# Altium PCB powermodule.PcbDoc (part 1 of 2)
Units mil, origin at the board's own origin, x right, y up, seen from the top; angles counter-clockwise.
Board outline 3937.01 x 1771.65 mil, 2 copper layers (Top, Bottom); 128 components, 96 nets, 567 pads, 424 vias.
Unrouted connection lines stored in the file: 15.
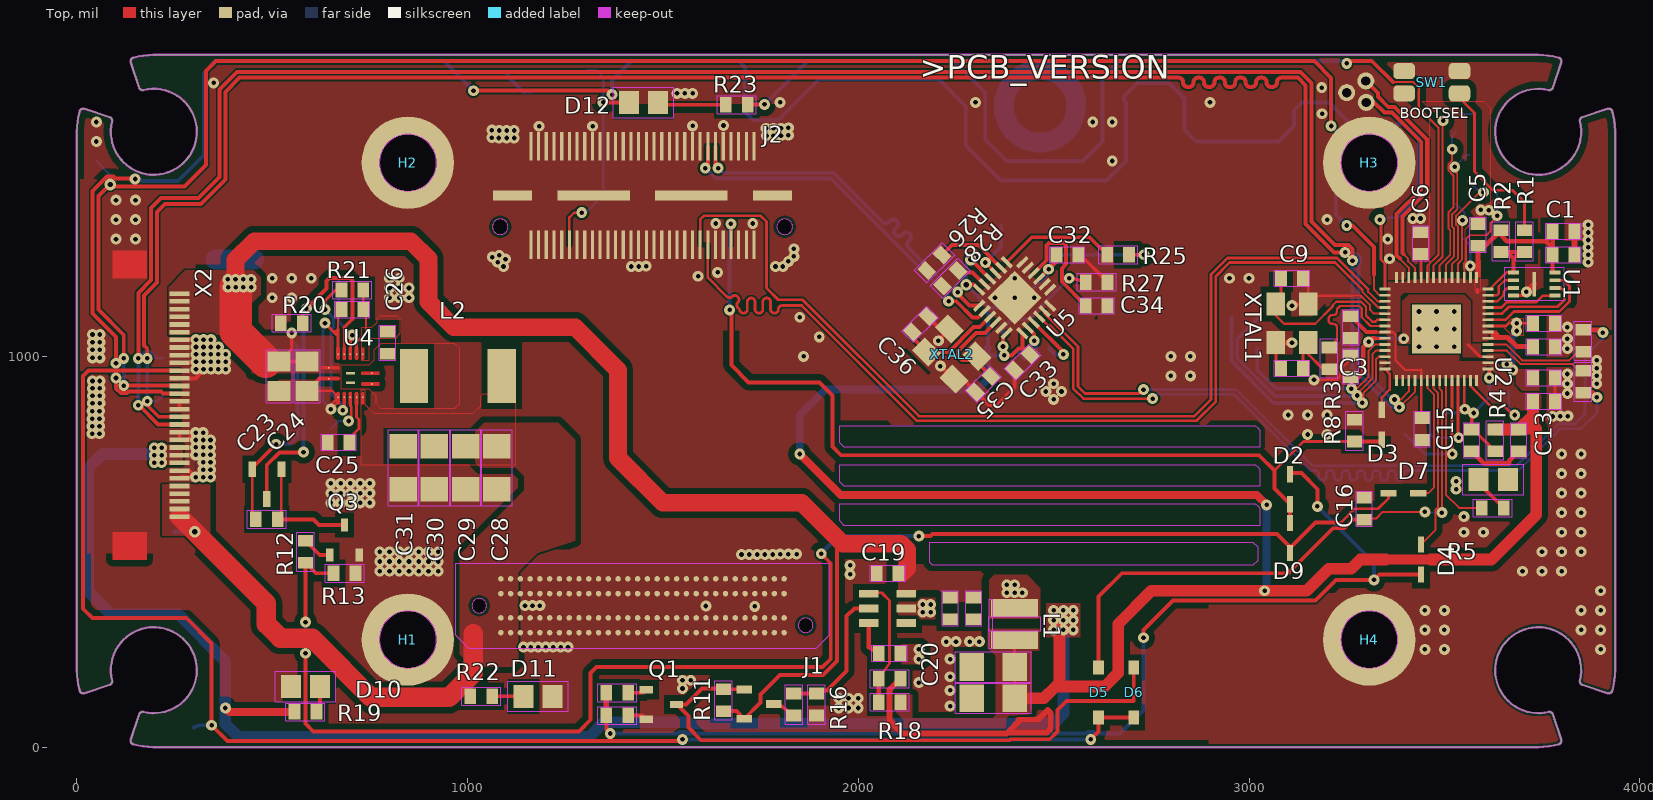
[diagram p0: Top view]
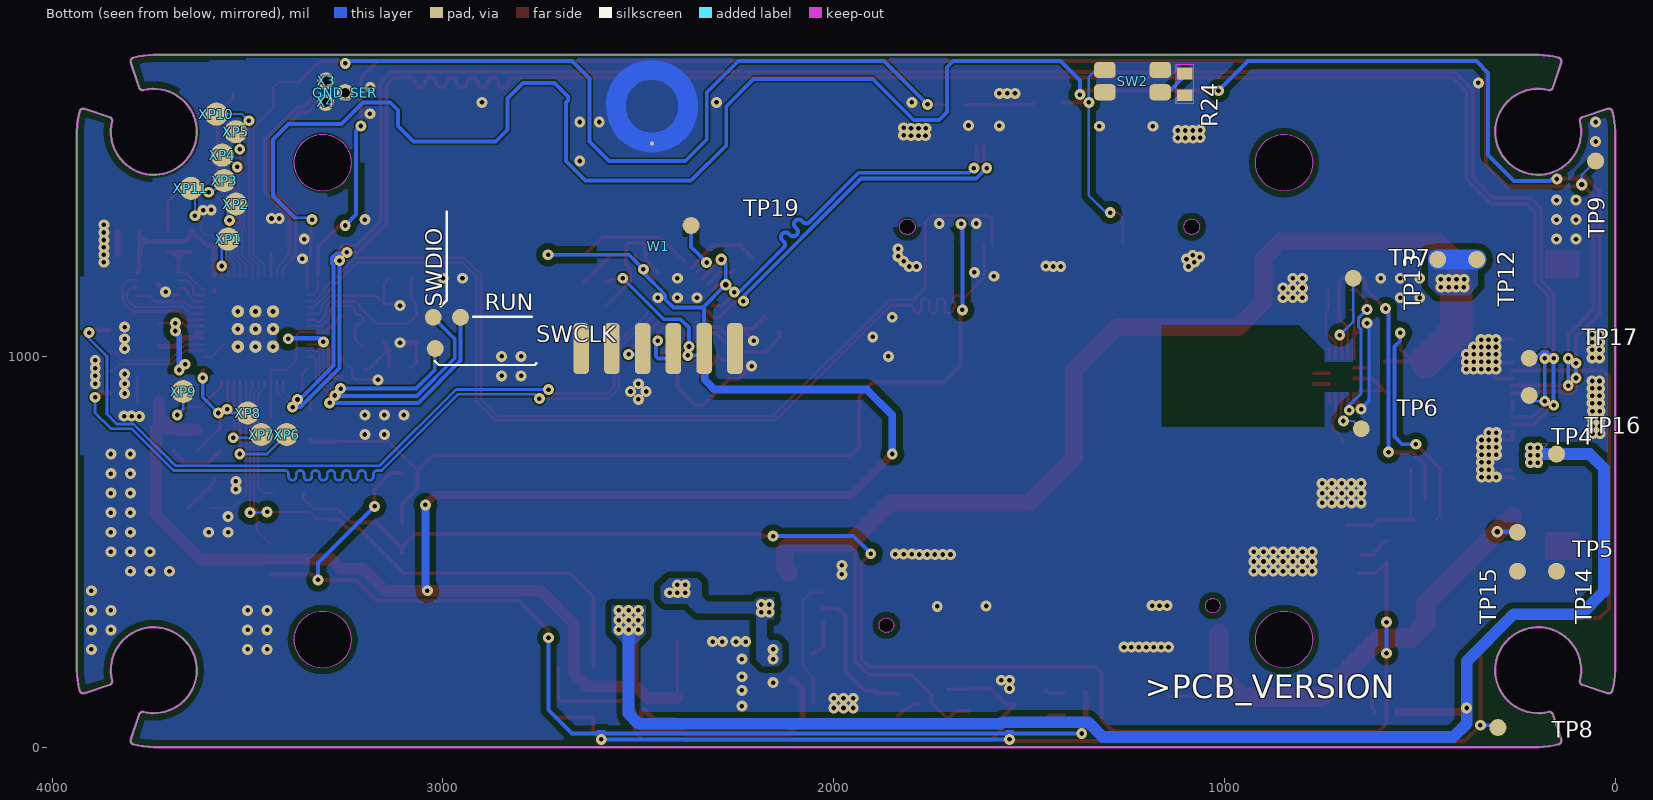
[diagram p1: Bottom view, seen from below]

## Layer stack, top to bottom
Top Solder: solder mask 0.4, Solder Resist, Dk 3.5
Top: signal copper 1.378
Dielectric 1: dielectric 12.6, FR-4, Dk 4.8
Bottom: signal copper 1.378
Bottom Solder: solder mask 0.4, Solder Resist, Dk 3.5

## Board outline
3792.87,1764.46 cw(c3789.83,1755.09) 3799.16,1751.93 3777.9,1688.1 cw(c3768.57,1691.22) 3766.48,1681.61 3765.69,1681.8 ccw(c3740.15,1574.8) 3705.39,1470.44 3714.62,1467.81 ccw(c3740.16,1574.8) 3847.02,1600.9 cw(c3856.58,1603.21) 3853.47,1612.55 3917.33,1633.82 cw(c3920.45,1624.48) 3929.99,1626.9 cw(c3740.12,1574.81) 3936.26,1591.93 3937.01,1574.8 3937.01,196.85 cw(c3740.16,196.87) 3929.7,143.72 3929.67,143.73 cw(c3920.44,147.17) 3917.33,137.83 3853.47,159.1 cw(c3856.59,168.44) 3847.02,170.78 ccw(c3740.16,196.86) 3639.22,240.58 3635.79,231.62 ccw(c3740.16,196.85) 3766.23,89.98 cw(c3768.57,80.42) 3777.91,83.54 3799.18,19.67 cw(c3789.84,16.56) 3794.02,7.65 3794.08,7.53 cw(c3740.16,196.85) 3740.16,0 196.85,0 195.06,0.01 cw(c196.83,196.85) 144.56,7.07 cw(c147.17,16.56) 137.83,19.67 159.1,83.54 cw(c168.44,80.42) 170.78,89.98 ccw(c196.85,196.85) 301.22,231.62 297.79,240.58 ccw(c196.85,196.86) 89.98,170.78 cw(c80.42,168.44) 83.54,159.1 19.67,137.83 cw(c16.56,147.17) 7.07,144.56 cw(c196.82,196.84) 0,196.85 0,1574.8 cw(c196.86,1574.82) 7.07,1627.1 cw(c16.56,1624.48) 19.67,1633.82 83.54,1612.55 cw(c80.42,1603.22) 89.98,1600.88 ccw(c196.85,1574.8) 297.79,1531.07 301.22,1540.04 ccw(c196.86,1574.8) 170.78,1681.67 cw(c168.44,1691.24) 159.1,1688.12 137.83,1751.98 cw(c147.17,1755.09) 144.56,1764.58 cw(c196.87,1574.81) 195.06,1771.65 196.85,1771.65 3740.16,1771.65 cw(c3740.16,1574.81)
cut-out: 847.2,1422.78 ccw(c847.2,1495.61) 920.03,1495.61 ccw(c847.2,1495.61) 847.2,1568.44 ccw(c847.2,1495.61) 774.37,1495.61 ccw(c847.2,1495.61)
cut-out: 847.2,202.29 ccw(c847.2,275.13) 920.03,275.13 ccw(c847.2,275.13) 847.2,347.96 ccw(c847.2,275.13) 774.37,275.13 ccw(c847.2,275.13)
cut-out: 3307.83,202.29 ccw(c3307.83,275.13) 3380.66,275.13 ccw(c3307.83,275.13) 3307.83,347.96 ccw(c3307.83,275.13) 3234.99,275.13 ccw(c3307.83,275.13)
cut-out: 3307.83,1422.78 ccw(c3307.83,1495.61) 3380.66,1495.61 ccw(c3307.83,1495.61) 3307.83,1568.44 ccw(c3307.83,1495.61) 3234.99,1495.61 ccw(c3307.83,1495.61)
cut-out: 1083.6,1311.75 ccw(c1083.6,1331.75) 1103.6,1331.75 ccw(c1083.6,1331.75) 1083.6,1351.75 ccw(c1083.6,1331.75) 1063.6,1331.75 ccw(c1083.6,1331.75)
cut-out: 1811.6,1311.75 ccw(c1811.6,1331.75) 1831.6,1331.75 ccw(c1811.6,1331.75) 1811.6,1351.75 ccw(c1811.6,1331.75) 1791.6,1331.75 ccw(c1811.6,1331.75)
cut-out: 1029.89,343.05 ccw(c1029.89,361.75) 1048.59,361.75 ccw(c1029.89,361.75) 1029.89,380.45 ccw(c1029.89,361.75) 1011.19,361.75 ccw(c1029.89,361.75)
cut-out: 1865.33,293.05 ccw(c1865.33,311.75) 1884.03,311.75 ccw(c1865.33,311.75) 1865.33,330.45 ccw(c1865.33,311.75) 1846.63,311.75 ccw(c1865.33,311.75)

## Design rules (kind name [scope] priority, off if disabled: settings)
BoardOutlineClearance mdCopperDimension [All] p1: gap=10 ignorepadtopadclearanceinfootprint=FALSE except(0: Arc-SplitContinuation Track-SplitContinuation SMDPad-SplitContinuation THPad-SplitContinuation Via-SplitContinuation Fill-SplitContinuation Poly-SplitContinuation Region-SplitContinuation Text-SplitContinuation; 7.87: Poly-OutlineEdge Poly-CavityEdge Poly-CutoutEdge Poly-SplitBarrior)
Clearance Clearance_for_PolygonClass_Isolate_16 [InPolygonClass('Isolate_16') vs IsArc Or IsTrack Or IsPad Or IsVia Or IsFill Or IsRegion Or IsText] p1: gap=16 ignorepadtopadclearanceinfootprint=FALSE
Clearance Clearance_for_PolygonClass_Isolate_20 [InPolygonClass('Isolate_20') vs IsArc Or IsTrack Or IsPad Or IsVia Or IsFill Or IsRegion Or IsText] p2: gap=20 ignorepadtopadclearanceinfootprint=FALSE
Clearance Clearance_for_PolygonClass_Isolate_10 [InPolygonClass('Isolate_10') vs IsArc Or IsTrack Or IsPad Or IsVia Or IsFill Or IsRegion Or IsText] p3: gap=10 ignorepadtopadclearanceinfootprint=FALSE
Clearance "Clearance (Same Net)" [All] p4: gap=5 ignorepadtopadclearanceinfootprint=FALSE
Clearance [All] p5: gap=5 ignorepadtopadclearanceinfootprint=FALSE
HoleSize "HoleSize_For_NetClass_dif pairs" [InNetClass('dif pairs')] p1: absolutevalues=TRUE maxlimit=0 minlimit=0 maxpercent=80.000 minpercent=20.000
HoleSize [All] p2: absolutevalues=TRUE maxlimit=100000 minlimit=11.81 maxpercent=80.000 minpercent=20.000
HoleToHoleClearance mdDrill [All] p1: gap=6 allowstackedmicrovias=TRUE
MinimumSolderMaskSliver [All] p1 off: minsoldermaskwidth=10
PasteMaskExpansion Expansion_SMDPaste_OFF [InPadClass('SMDPaste_OFF')] p1: expansion=0
PasteMaskExpansion mlMinCreamFrame [All] p2: expansion=0
PolygonConnect PolygonConnect_For_PolygonThermal_ON_Width100000_Gap100000 [InPolygonClass('PolygonThermal_ON_Width100000_Gap100000') vs Not IsVia] p1: connectstyle=Relief reliefconductorwidth=10 reliefentries=4 polygonreliefangle="90 Angle" airgapwidth=10
PolygonConnect PolygonConnect_For_PolygonThermal_ON_Width50000_Gap100000 [InPolygonClass('PolygonThermal_ON_Width50000_Gap100000') vs Not IsVia] p2: connectstyle=Relief reliefconductorwidth=5 reliefentries=4 polygonreliefangle="90 Angle" airgapwidth=10
PolygonConnect PolygonConnect_For_PolygonThermal_ON_Width60000_Gap100000 [InPolygonClass('PolygonThermal_ON_Width60000_Gap100000') vs Not IsVia] p3: connectstyle=Relief reliefconductorwidth=6 reliefentries=4 polygonreliefangle="90 Angle" airgapwidth=10
PolygonConnect PolygonConnect_For_PolygonThermal_ON_Width200000_Gap100000 [InPolygonClass('PolygonThermal_ON_Width200000_Gap100000') vs Not IsVia] p4: connectstyle=Relief reliefconductorwidth=20 reliefentries=4 polygonreliefangle="90 Angle" airgapwidth=10
PolygonConnect PolygonConnect_For_PolygonThermal_ON_Width70000_Gap100000 [InPolygonClass('PolygonThermal_ON_Width70000_Gap100000') vs Not IsVia] p5: connectstyle=Relief reliefconductorwidth=7 reliefentries=4 polygonreliefangle="90 Angle" airgapwidth=10
PolygonConnect PolygonConnect_For_PolygonThermal_OFF [InPolygonClass('PolygonThermal_OFF')] p6: connectstyle=Direct reliefconductorwidth=10 reliefentries=4 polygonreliefangle="90 Angle" airgapwidth=10
PolygonConnect ThermalVias [IsVia] p7: connectstyle=Direct reliefconductorwidth=10 reliefentries=4 polygonreliefangle="90 Angle" airgapwidth=10
PolygonConnect [All] p8: connectstyle=Relief reliefconductorwidth=10 reliefentries=4 polygonreliefangle="90 Angle" airgapwidth=10
RoutingVias [All] p1: holewidth=11.81 width=17.81 viastyle="Through Hole" minholewidth=11.81 minwidth=17.81 maxholewidth=100 maxwidth=100
SolderMaskExpansion Expansion_SMDSolder_OFF [InPadClass('SMDSolder_OFF')] p1: expansion=0 istentingtop=FALSE
SolderMaskExpansion mlMinStopFrame [All] p2: expansion=4 istentingtop=FALSE
Width "Width_For_NetClass_dif pairs" [InNetClass('dif pairs')] p1: maxlimit=10 minlimit=99999 preferedwidth=5 toplayer_minwidth=0 bottomlayer_minwidth=0
Width [All] p2: maxlimit=10 minlimit=5 preferedwidth=5
26 further rules are at their usual default settings.

## Classes and differential pairs
polygon class PolygonThermal_ON_Width100000_Gap100000: Polygon_13_Net_GND
polygon class PolygonThermal_ON_Width50000_Gap100000: Polygon_2_Net_+1V1 Polygon_3_Net_+1V1 Polygon_15_Net_GND Polygon_16_Net_GND
polygon class PolygonThermal_ON_Width200000_Gap100000: Polygon_6_Net_+3V3
polygon class PolygonThermal_ON_Width70000_Gap100000: Polygon_3_Net_N$8 Polygon_7_Net_+3V3 Polygon_8_Net_+3V3 Polygon_8_Net_GND Polygon_10_Net_GND Polygon_11_Net_GND Polygon_12_Net_GND Polygon_14_Net_GND Polygon_18_Net_GND
polygon class PolygonThermal_OFF: Polygon_1_Net_+1V1 Polygon_1_Net_+3V3 Polygon_1_Net_+5V Polygon_1_Net_+12V Polygon_1_Net_GND Polygon_1_Net_N$2 Polygon_1_Net_N$8 Polygon_1_Net_N$19 Polygon_2_Net_+3V3 Polygon_2_Net_+5V Polygon_2_Net_+12V Polygon_2_Net_GND Polygon_2_Net_N$8 Polygon_3_Net_+3V3 Polygon_3_Net_+5V Polygon_3_Net_+12V Polygon_3_Net_GND Polygon_4_Net_+3V3 Polygon_4_Net_+12V Polygon_4_Net_GND Polygon_4_Net_N$8 Polygon_5_Net_+3V3 Polygon_5_Net_GND Polygon_5_Net_N$8 Polygon_7_Net_GND Polygon_9_Net_GND Polygon_17_Net_GND
polygon class Isolate_16: Polygon_2_Net_GND Polygon_3_Net_GND
polygon class Isolate_20: Polygon_1_Net_+12V
polygon class Isolate_10: Polygon_1_Net_N$8
pad class SMDSolder_OFF: W1-P$1 X2-1 X2-2 X2-3 X2-4 X2-5 X2-6 X2-7 X2-8 X2-9 X2-10 X2-11 X2-12 X2-13 X2-14 X2-15 X2-16 X2-17 X2-18 X2-19 X2-20 X2-21 X2-22 X2-23 X2-24 X2-25 X2-26 X2-27 X2-28 X2-29 X2-30
pad class SMDPaste_OFF: -TP H1-P$1 H2-P$1 H3-P$1 H4-P$1 SWCLK-TP SWDIO-TP TP4-TP TP5-TP TP6-TP TP7-TP TP8-TP TP9-TP TP12-TP TP13-TP TP14-TP TP15-TP TP16-TP TP17-TP TP19-TP U2-57 W1-P$1 X2-1 X2-2 X2-3 X2-4 X2-5 X2-6 X2-7 X2-8 X2-9 X2-10 X2-11 X2-12 X2-13 X2-14 X2-15 X2-16 X2-17 X2-18 X2-19 X2-20 X2-21 X2-22 X2-23 X2-24 X2-25 X2-26 X2-27 X2-28 X2-29 X2-30
net class "dif pairs": D_N D_P USB_D_N USB_D_P

## Components (designator, comment, footprint, x,y, rotation, side; value= is the part's Value field where it differs from the comment)
C1 "100nF" C0603 3805,1320 r0 top
C2 "2u2F" C0603 3805,1260 r0 top
C3 "100nF" C0603 3260,1075 r90 top
C4 "2u2F" C0603 3755,945 r180 top
C5 "100nF" C0603 3586,1311 r90 top
C6 "100nF" C0603 3440,1290 r90 top
C7 "2u2F" C0603 3755,885 r180 top
C8 "100nF" C0603 3260,975 r90 top
C9 "10pF" C0603 3110,1200 r180 top
C10 "10pF" C0603 3110,970 r180 top
C11 "2u2F" C0603 3570,785 r90 top
C12 "100nF" C0603 3755,1025 r0 top
C13 "100nF" C0603 3690,785 r270 top
C14 "100nF" C0603 3755,1085 r180 top
C15 "100nF" C0603 3443,814 r90 top
C16 "100nF" C0603 3295,610 r90 top
C17 "10uF" C0603 2235,355 r270 top
C18 "10uF" C0603 2295,355 r270 top
C19 "100nF" C0603 2075,445 r180 top
C20 "100nF" C0603 2080,240 r0 top
C21 "22uF" C1206 2345,125 r180 top
C22 "22uF" C1206 2345,205 r180 top
C23 "10uF" C0805 517.76,949.21 r270 top
C24 "10uF" C0805 589.49,949.21 r270 top
C25 "4u7F" C0603 670,780 r180 top
C26 "100nF" C0603 795,1035 r270 top
C27 "2u2F" C0603 705,1120 r180 top
C28 "22uF" C1206 1075,715 r270 top
C29 "22uF" C1206 995,715 r270 top
C30 "22uF" C1206 915,715 r270 top
C31 "22uF" C1206 835,715 r270 top
C32 "1uF" C0603 2535,1260 r0 top
C33 "100nF" C0603 2420,985 r225 top
C34 "1uF" C0603 2610,1130 r0 top
C35 "10pF" C0603 2320,929 r225 top
C36 "10pF" C0603 2158,1082 r225 top
D1 "YL" LED_0805 3625,685 r0 top
D2 "1N4148WS" SOD323_NEX-L 3105,660 r270 top
D3 "1N4148WS" SOD323_NEX-L 3340,825 r90 top
D4 "1N4148WS" SOD323_NEX-L 3440,480 r90 top
D5 "" SOD-123_ONS-L 2615,140 r90 top
D6 "" SOD-123_ONS-L 2705,140 r90 top
D7 "1N4148WS" SOD323_NEX-L 3395,650 r0 top
D9 "1N4148WS" SOD323_NEX-L 3105,535 r90 top
D10 "GN" LED_0805 585,155 r180 top
D11 "BL" LED_0805 1180,130 r0 top
D12 "YL" LED_0805 1450,1650 r180 top
GND_SER "" TH-0.75/0.6 3250,1675 r180 bottom
H1 "" SMT_SPACER_5MMX2.5M 847.2,275.13 r0 top
H2 "" SMT_SPACER_5MMX2.5M 847.2,1495.61 r0 top
H3 "" SMT_SPACER_5MMX2.5M 3307.83,1495.61 r0 top
H4 "" SMT_SPACER_5MMX2.5M 3307.83,275.13 r0 top
J1 "ADM6-30-01.5-L-4-2-A-TR" SAMTEC_ADM6-30-01.5-L-4-2-A-TR 1447.61,361.75 r180 top
J2 "QTH-030-01-L-D-ACONN_QTH-030-02-L-D-A-K-FR_S00" CONN_QTH-030-02-L-D-A-K-FR_S00 1447.6,1411.75 r0 top
L1 "VLS3012HBX-3R3MIND_VLS3012HBX-3R3M_TDK-L" IND_VLS3012HBX-3R3M_TDK-L 2400,315 r90 top
L2 "" HA72L-06301R5LFTR 975,950 r180 top
Q1 "2N7002,215TO-236AB_NEX-L" TO-236AB_NEX-L 1496,109 r270 top
Q2 "SI2301CDS-T1-GE3TO-236_VIS-L" TO-236_VIS-L 1746,110 r270 top
Q3 "2N7002,215TO-236AB_NEX-L" TO-236AB_NEX-L 685,530 r0 top
Q4 "SI2301CDS-T1-GE3TO-236_VIS-L" TO-236_VIS-L 486,673 r180 top
R1 "1K" R0603 3705,1295 r270 top
R2 "10k" R0603 3645,1295 r90 top
R3 "1K" R0603 3205,995 r270 top
R4 "200R" R0603 3630,785 r90 top
R5 "200R" R0603 3624,612 r180 top
R6 "27R" R0603 3855,935 r270 top
R7 "27R" R0603 3855,1040 r90 top
R8 "10k" R0603 3270,810 r270 top
R9 "4k7" R0603 1383,139 r180 top
R10 "100k" R0603 1383,81 r0 top
R11 "100k" R0603 1655,120 r90 top
R12 "4k7" R0603 585,500 r270 top
R13 "100k" R0603 685,445 r0 top
R14 "100k" R0603 486,583 r0 top
R15 "10k" R0603 1835,109 r90 top
R16 "100k" R0603 1893,109 r90 top
R17 "10k" R0603 2080,175 r180 top
R18 "33k2" R0603 2080,115 r0 top
R19 "200R" R0603 585,90 r180 top
R20 "100k" R0603 550,1085 r0 top
R21 "100k" R0603 705,1170 r0 top
R22 "200R" R0603 1035,130 r180 top
R23 "200R" R0603 1689,1644 r0 top
R24 "1K" R0603 1101,1696 r270 bottom
R25 "50k" R0603 2665,1260 r0 top
R26 "50k" R0603 2195,1240 r225 top
R27 "12k" R0603 2610,1190 r0 top
R28 "50k" R0603 2235,1200 r225 top
SW1 "" EVQ-P7J01P 3397,1673 r0 top
SW2 "FASTBOOT" EVQ-P7J01P 1306,1676 r180 bottom
SWCLK "TPTP11R" TP11R 3020,1020 r90 bottom
SWDIO "TPTP11R" TP11R 3025,1100 r270 bottom
TP4 "TPTP11R" TP11R 150,750 r180 bottom
TP5 "TPTP11R" TP11R 250,550 r180 bottom
TP6 "TPTP11R" TP11R 650,815 r180 bottom
TP7 "TPTP11R" TP11R 670,1200 r180 bottom
TP8 "TPTP11R" TP11R 300,50 r180 bottom
TP9 "TPTP11R" TP11R 50,1500 r180 bottom
TP11 "TPTP11R" TP11R 2955,1100 r270 bottom
TP12 "TPTP11R" TP11R 354,1248 r90 bottom
TP13 "TPTP11R" TP11R 454,1248 r90 bottom
TP14 "TPTP11R" TP11R 150,450 r270 bottom
TP15 "TPTP11R" TP11R 250,450 r270 bottom
TP16 "TPTP11R" TP11R 220,900 r270 bottom
TP17 "TPTP11R" TP11R 220,995 r270 bottom
TP19 "TPTP11R" TP11R 2365,1335 r180 bottom
U1 "W25Q16JVUXIQW25Q16JVUXIQ_WIN-L" W25Q16JVUXIQ_WIN-L 3730,1185 r0 top
U2 "RP2040" RP2040TR7_RPI-L 3480,1070 r270 top
U3 "TPS563201DDCR" DDC0006A_L 2075,355 r180 top
U4 "RT7291AGQUF" RT7291AGQUF 700,950 r0 top
U5 "USB2422/MJ_SQFN-4X4" SQFN24_4X4 2400,1150 r135 top
W1 "" WIFI-RTL8188EUS 2445,990 r180 bottom
X2 "FH12-30S-0.5SH" FH12-30S-0.5SH 135,875 r270 top
X3 "" TH-0.75/0.6 3299,1705 r180 bottom
X4 "" TH-0.75/0.6 3300,1650 r180 bottom
XP1 "" SMT-PAD_R1-5MM 3550,1300 r180 bottom
XP2 "" SMT-PAD_R1-5MM 3530,1390 r180 bottom
XP3 "" SMT-PAD_R1-5MM 3560,1450 r180 bottom
XP4 "" SMT-PAD_R1-5MM 3565,1515 r180 bottom
XP5 "" SMT-PAD_R1-5MM 3530,1575 r180 bottom
XP6 "" SMT-PAD_R1-5MM 3400,800 r180 bottom
XP7 "" SMT-PAD_R1-5MM 3465,800 r180 bottom
XP8 "" SMT-PAD_R1-5MM 3500,855 r180 bottom
XP9 "" SMT-PAD_R1-5MM 3665,910 r180 bottom
XP10 "" SMT-PAD_R1-5MM 3580,1620 r180 bottom
XP11 "" SMT-PAD_R1-5MM 3645,1430 r180 bottom
XTAL1 "12MHz" SMD3225_3.2X2.5X0.7_MTC-L 3110,1085 r0 top
XTAL2 "" SMD3225_3.2X2.5X0.7_MTC-L 2239,1006 r225 top

## Footprints (in the part's own frame and the unit in brackets; to place one, negate y for a bottom-side part, rotate by r counter-clockwise, add the part's x,y. Pads: shape width x height; smd on the part's side, far side on the other; paste and mask are expansions set on the pad)
C0603 [mil] "C0603"
  rect 30x39.4 smd: 1(-28,0) 2(28,0)
  Top keep-out lines w2: -44.96,-20.56 -44.96,20.56 44.96,20.56 44.96,-20.56 -44.96,-20.56
C0805 [mil] "C0805"
  rect 51.18x59.06 smd: 1(-37.4,0) 2(37.4,0)
  Top keep-out lines w2: 67.68,-33.7 67.68,33.7 -67.68,33.7 -67.68,-33.7 67.68,-33.7
C1206 [mil] "C1206"
  rect 62.99x70.87 smd: 1(-55.12,0) 2(55.12,0)
  Top keep-out lines w2: 97.36,38.7 97.36,-38.7 -97.36,-38.7 -97.36,38.7 97.36,38.7
CONN_QTH-030-02-L-D-A-K-FR_S00 [mil] "CONN_QTH-030-02-L-D-A-K-FR_S00"
  rect 8x72 smd: 1(285.51,-126) 2(285.51,126) 3(265.82,-126) 4(265.82,126) 5(246.13,-126) 6(246.13,126) 7(226.44,-126) 8(226.44,126) 9(206.75,-126) 10(206.75,126) 11(187.06,-126) 12(187.06,126) 13(167.37,-126) 14(167.37,126) 15(147.68,-126) 16(147.68,126) 17(127.99,-126) 18(127.99,126) 19(108.3,-126) 20(108.3,126) 21(88.6,-126) 22(88.6,126) 23(68.92,-126) 24(68.92,126) 25(49.23,-126) 26(49.23,126) 27(29.53,-126) 28(29.53,126) 29(9.85,-126) 30(9.85,126) 31(-9.85,-126) 32(-9.85,126) 33(-29.53,-126) 34(-29.53,126) 35(-49.23,-126) 36(-49.23,126) 37(-68.92,-126) 38(-68.92,126) 39(-88.6,-126) 40(-88.6,126) 41(-108.3,-126) 42(-108.3,126) 43(-127.99,-126) 44(-127.99,126) 45(-147.68,-126) 46(-147.68,126) 47(-167.37,-126) 48(-167.37,126) 49(-187.06,-126) 50(-187.06,126) 51(-206.75,-126) 52(-206.75,126) 53(-226.44,-126) 54(-226.44,126) 55(-246.13,-126) 56(-246.13,126) 57(-265.82,-126) 58(-265.82,126) 59(-285.51,-126) 60(-285.51,126)
  rect 185x25 smd: 61(125,0) 62(-125,0)
  rect 100x25 smd: 63(332.5,0) 64(-332.5,0)
DDC0006A_L [mil] "DDC0006A_L"
  rect 50x20 smd: 1(-48,37.4) 2(-48,0) 3(-48,-37.4) 4(48,-37.4) 5(48,0) 6(48,37.4)
EVQ-P7J01P [mil] "EVQ-P7J01P"
  rrect50% 55.12x41.34 smd: 1(0,57.09) 2(141.73,57.09) 3(0,0) 4(141.73,0)
FH12-30S-0.5SH [mil] "FH12-30S-0.5SH"
  rect 11.81x51.18 smd paste+0 mask+0: 1(-285.43,127.95) 2(-265.75,127.95) 3(-246.06,127.95) 4(-226.38,127.95) 5(-206.69,127.95) 6(-187.01,127.95) 7(-167.32,127.95) 8(-147.64,127.95) 9(-127.95,127.95) 10(-108.27,127.95) 11(-88.58,127.95) 12(-68.9,127.95) 13(-49.21,127.95) 14(-29.53,127.95) 15(-9.84,127.95) 16(9.84,127.95) 17(29.53,127.95) 18(49.21,127.95) 19(68.9,127.95) 20(88.58,127.95) 21(108.27,127.95) 22(127.95,127.95) 23(147.64,127.95) 24(167.32,127.95) 25(187.01,127.95) 26(206.69,127.95) 27(226.38,127.95) 28(246.06,127.95) 29(265.75,127.95) 30(285.43,127.95)
  Top region: -324.8,43.31 -324.8,-43.31 -395.67,-43.31 -395.67,43.31
  Top region: 395.67,43.31 395.67,-43.31 324.8,-43.31 324.8,43.31
HA72L-06301R5LFTR [mil] "HA72L-06301R5LFTR"
  rect 72.83x137.8 smd: P$1(-112.2,0) P$2(112.2,0)
IND_VLS3012HBX-3R3M_TDK-L [mil] "IND_VLS3012HBX-3R3M_TDK-L"
  rect 46x120 smd: 1(-41,0) 2(41,0)
  Top keep-out region: -62,56 62,56 62,66 -62,66
  Top keep-out region: -19,66 19,66 19,-66 -19,-66
  Top keep-out region: -19,66 19,66 19,-66 -19,-66
LED_0805 [mil] "LED_0805"
  rect 51.18x59.06 smd: A(-37.4,0) C(37.4,0)
  Top keep-out lines w2: -77.68,-38.7 -77.68,38.7 77.68,38.7 77.68,-38.7 -77.68,-38.7
R0603 [mil] "R0603"
  rect 30x39.4 smd: 1(-28,0) 2(28,0)
  Top keep-out lines w2: 49.96,-22.56 -49.96,-22.56 -49.96,22.56 49.96,22.56 49.96,-22.56
RP2040TR7_RPI-L [mil] "RP2040TR7_RPI-L"
  rect 28x7 smd: 1(-132,102.38) 2(-132,86.63) 3(-132,70.88) 4(-132,55.13) 5(-132,39.38) 6(-132,23.63) 7(-132,7.88) 8(-132,-7.88) 9(-132,-23.63) 10(-132,-39.38) 11(-132,-55.13) 12(-132,-70.88) 13(-132,-86.63) 14(-132,-102.38) 29(132,-102.38) 30(132,-86.63) 31(132,-70.88) 32(132,-55.13) 33(132,-39.38) 34(132,-23.63) 35(132,-7.88) 36(132,7.88) 37(132,23.63) 38(132,39.38) 39(132,55.13) 40(132,70.88) 41(132,86.63) 42(132,102.38)
  rect 7x28 smd: 15(-102.38,-132) 16(-86.63,-132) 17(-70.88,-132) 18(-55.13,-132) 19(-39.38,-132) 20(-23.63,-132) 21(-7.88,-132) 22(7.88,-132) 23(23.63,-132) 24(39.38,-132) 25(55.13,-132) 26(70.88,-132) 27(86.63,-132) 28(102.38,-132) 43(102.38,132) 44(86.63,132) 45(70.88,132) 46(55.13,132) 47(39.38,132) 48(23.63,132) 49(7.88,132) 50(-7.88,132) 51(-23.63,132) 52(-39.38,132) 53(-55.13,132) 54(-70.88,132) 55(-86.63,132) 56(-102.38,132)
  rect 126x126 smd paste+0: 57(0,0)
  round 31.81 hole 11.81: 58(-45,45) 59(-45,0) 60(-45,-45) 61(0,-45) 62(45,-45) 63(45,0) 64(45,45) 65(0,45) 66(0,0)
RT7291AGQUF [mil] "RT7291AGQUF"
  rect 3.94x3.94 smd: P$1(-55.12,20.67) P$2(-55.12,-6.89) P$3(-31.5,-55.12) P$4(-15.75,-55.12) P$5(0,-55.12) P$6(15.75,-55.12) P$7(31.5,-55.12) P$8(55.12,-20.67) P$9(55.12,6.89) P$10(31.5,55.12) P$11(15.75,55.12) P$12(0,55.12) P$13(-15.75,55.12) P$14(-31.5,55.12)
  rect 23.62x5.91 smd: P$15(0,6.5) P$16(0,-17.13)
  Top region: -27.37,45.28 -27.37,72.28 -35.62,72.28 -35.62,45.27 -35.31,43.69 -34.4,42.34 -33.05,41.45 -31.46,41.15 -31.46,41.15 -29.41,41.71 -27.91,43.23 -27.37,45.28
  Top region: -11.62,45.28 -11.62,72.28 -19.88,72.28 -19.88,45.28 -19.57,43.7 -18.67,42.36 -17.33,41.46 -15.75,41.14 -15.75,41.14 -14.17,41.46 -12.83,42.36 -11.93,43.7 -11.62,45.28
  Top region: 4.13,45.28 4.13,72.28 -4.13,72.28 -4.13,45.28 -3.82,43.7 -2.92,42.36 -1.58,41.46 0,41.14 0,41.14 1.58,41.46 2.92,42.36 3.82,43.7 4.13,45.28
  Top region: 19.88,45.28 19.88,72.28 11.62,72.28 11.62,45.28 11.93,43.7 12.83,42.36 14.17,41.46 15.75,41.14 15.75,41.14 17.33,41.46 18.67,42.36 19.57,43.7 19.88,45.28
  Top region: 35.62,45.27 35.62,72.28 27.37,72.28 27.37,45.28 27.91,43.23 29.41,41.71 31.46,41.15 31.46,41.15 33.05,41.45 34.4,42.34 35.31,43.69 35.62,45.27
  Top region: 74.25,2.57 74.25,10.83 31.5,10.83 29.45,10.28 27.93,8.78 27.37,6.73 27.37,6.73 27.67,5.14 28.56,3.79 29.91,2.88 31.5,2.57 31.5,2.57
  Top region: 74.25,-24.8 74.25,-16.53 31.5,-16.53 29.92,-16.85 28.58,-17.75 27.68,-19.09 27.37,-20.67 27.37,-20.67 27.68,-22.25 28.58,-23.59 29.92,-24.49 31.5,-24.8 31.5,-24.8
  Top region: -74.25,-2.75 -74.25,-11.02 -31.5,-11.02 -29.92,-10.71 -28.58,-9.81 -27.68,-8.47 -27.37,-6.89 -27.37,-6.89 -27.68,-5.31 -28.58,-3.97 -29.92,-3.07 -31.5,-2.75 -31.5,-2.75
  Top region: -74.25,24.8 -74.25,16.53 -27.37,16.53 -27.37,20.75 -31.42,24.8
  Top region: 27.37,-45.28 27.37,-72.28 35.62,-72.28 35.62,-45.27 35.31,-43.69 34.4,-42.34 33.05,-41.45 31.46,-41.15 31.46,-41.15 29.41,-41.71 27.91,-43.23 27.37,-45.28
  Top region: 11.62,-45.28 11.62,-72.28 19.88,-72.28 19.88,-45.28 19.57,-43.7 18.67,-42.36 17.33,-41.46 15.75,-41.14 15.75,-41.14 14.17,-41.46 12.83,-42.36 11.93,-43.7 11.62,-45.28
  Top region: -4.13,-45.28 -4.13,-72.28 4.13,-72.28 4.13,-45.28 3.82,-43.7 2.92,-42.36 1.58,-41.46 0,-41.14 0,-41.14 -1.58,-41.46 -2.92,-42.36 -3.82,-43.7 -4.13,-45.28
  Top region: -19.88,-45.28 -19.88,-72.28 -11.62,-72.28 -11.62,-45.28 -11.93,-43.7 -12.83,-42.36 -14.17,-41.46 -15.75,-41.14 -15.75,-41.14 -17.33,-41.46 -18.67,-42.36 -19.57,-43.7 -19.88,-45.28
  Top region: -35.62,-45.27 -35.62,-72.28 -27.37,-72.28 -27.37,-45.28 -27.91,-43.23 -29.41,-41.71 -31.46,-41.15 -31.46,-41.15 -33.05,-41.45 -34.4,-42.34 -35.31,-43.69 -35.62,-45.27
SAMTEC_ADM6-30-01.5-L-4-2-A-TR [mil] "SAMTEC_ADM6-30-01.5-L-4-2-A-TR"
  rrect100% 14.02x14.02 smd: A01(362.5,68.9) A02(337.5,68.9) A03(312.5,68.9) A04(287.5,68.9) A05(262.5,68.9) A06(237.5,68.9) A07(212.5,68.9) A08(187.5,68.9) A09(162.5,68.9) A10(137.5,68.9) A11(112.5,68.9) A12(87.5,68.9) A13(62.5,68.9) A14(37.5,68.9) A15(12.5,68.9) A16(-12.5,68.9) A17(-37.5,68.9) A18(-62.5,68.9) A19(-87.5,68.9) A20(-112.5,68.9) A21(-137.5,68.9) A22(-162.5,68.9) A23(-187.5,68.9) A24(-212.5,68.9) A25(-237.5,68.9) A26(-262.5,68.9) A27(-287.5,68.9) A28(-312.5,68.9) A29(-337.5,68.9) A30(-362.5,68.9) B01(362.5,31.1) B02(337.5,31.1) B03(312.5,31.1) B04(287.5,31.1) B05(262.5,31.1) B06(237.5,31.1) B07(212.5,31.1) B08(187.5,31.1) B09(162.5,31.1) B10(137.5,31.1) B11(112.5,31.1) B12(87.5,31.1) B13(62.5,31.1) B14(37.5,31.1) B15(12.5,31.1) B16(-12.5,31.1) B17(-37.5,31.1) B18(-62.5,31.1) B19(-87.5,31.1) B20(-112.5,31.1) B21(-137.5,31.1) B22(-162.5,31.1) B23(-187.5,31.1) B24(-212.5,31.1) B25(-237.5,31.1) B26(-262.5,31.1) B27(-287.5,31.1) B28(-312.5,31.1) B29(-337.5,31.1) B30(-362.5,31.1) C01(362.5,-31.1) C02(337.5,-31.1) C03(312.5,-31.1) C04(287.5,-31.1) C05(262.5,-31.1) C06(237.5,-31.1) C07(212.5,-31.1) C08(187.5,-31.1) C09(162.5,-31.1) C10(137.5,-31.1) C11(112.5,-31.1) C12(87.5,-31.1) C13(62.5,-31.1) C14(37.5,-31.1) C15(12.5,-31.1) C16(-12.5,-31.1) C17(-37.5,-31.1) C18(-62.5,-31.1) C19(-87.5,-31.1) C20(-112.5,-31.1) C21(-137.5,-31.1) C22(-162.5,-31.1) C23(-187.5,-31.1) C24(-212.5,-31.1) C25(-237.5,-31.1) C26(-262.5,-31.1) C27(-287.5,-31.1) C28(-312.5,-31.1) C29(-337.5,-31.1) C30(-362.5,-31.1) D01(362.5,-68.9) D02(337.5,-68.9) D03(312.5,-68.9) D04(287.5,-68.9) D05(262.5,-68.9) D06(237.5,-68.9) D07(212.5,-68.9) D08(187.5,-68.9) D09(162.5,-68.9) D10(137.5,-68.9) D11(112.5,-68.9) D12(87.5,-68.9) D13(62.5,-68.9) D14(37.5,-68.9) D15(12.5,-68.9) D16(-12.5,-68.9) D17(-37.5,-68.9) D18(-62.5,-68.9) D19(-87.5,-68.9) D20(-112.5,-68.9) D21(-137.5,-68.9) D22(-162.5,-68.9) D23(-187.5,-68.9) D24(-212.5,-68.9) D25(-237.5,-68.9) D26(-262.5,-68.9) D27(-287.5,-68.9) D28(-312.5,-68.9) D29(-337.5,-68.9) D30(-362.5,-68.9)
  Top keep-out lines w1.97: 477.76,75.51 477.76,-108.27 -477.76,-108.27 -477.76,75.51 -445,108.27 445,108.27 477.76,75.51
SMD3225_3.2X2.5X0.7_MTC-L [mil] "SMD3225_3.2X2.5X0.7_MTC-L"
  rect 47x59 smd: 1(-41.5,49.5) 2(-41.5,-49.5) 3(41.5,-49.5) 4(41.5,49.5)
SMT-PAD_R1-5MM [mil] "SMT-PAD_R1-5MM"
  rrect100% 59.06x59.06 smd: P$1(0,0)
SMT_SPACER_5MMX2.5M [mm] "SMT_SPACER_5MMX2.5M"
  rrect100% 6x6 smd paste+0: P$1(0,0)
SOD323_NEX-L [mil] "SOD323_NEX-L"
  rect 41.5x16 smd: 1(-38.25,0) 2(38.25,0)
SOD-123_ONS-L [mil] "SOD-123_ONS-L"
  rect 36x28 smd: 1(-64,0) 2(64,0)
SQFN24_4X4 [mil] "SQFN24_4X4"
  rect 36x10 smd: 1(-78.5,50) 2(-78.5,30) 3(-78.5,10) 4(-78.5,-10) 5(-78.5,-30) 6(-78.5,-50) 13(78.5,-50) 14(78.5,-30) 15(78.5,-10) 16(78.5,10) 17(78.5,30) 18(78.5,50)
  rect 10x36 smd: 7(-50,-78.5) 8(-30,-78.5) 9(-10,-78.5) 10(10,-78.5) 11(30,-78.5) 12(50,-78.5) 19(50,78.5) 20(30,78.5) 21(10,78.5) 22(-10,78.5) 23(-30,78.5) 24(-50,78.5)
  rect 98x98 smd: 25(0,0)
TH-0.75/0.6 [mil] "TH-0.75/0.6"
  round 43.62 hole 23.62: P$2(0,0)
TO-236_VIS-L [mil] "TO-236_VIS-L"
  rect 20x40 smd: 1(-37.4,-38) 2(37.4,-38) 3(0,38)
TO-236AB_NEX-L [mil] "TO-236AB_NEX-L"
  rect 19x34 smd: 1(-37.5,-38.5) 2(37.5,-38.5) 3(0,38.5)
TP11R [mil] "TP11R"
  rrect100% 43.31x43.31 smd paste+0: TP(0,0)
W25Q16JVUXIQ_WIN-L [mil] "W25Q16JVUXIQ_WIN-L"
  rect 28x10 smd: 1(-53.06,29.53) 2(-53.06,9.84) 3(-53.06,-9.84) 4(-53.06,-29.53) 5(53.06,-29.53) 6(53.06,-9.84) 7(53.06,9.84) 8(53.06,29.53)
  rect 8x63 smd: 9(0,0)
  Top keep-out region: -75.06,-42.5 -75.06,42.5 75.06,42.5 75.06,-42.5
WIFI-RTL8188EUS [mil] "WIFI-RTL8188EUS"
  rrect50% 40x130 smd: GND(-122.72,30) IO1(192.24,30) IO2(-201.46,30) USB-DM(34.76,30) USB-DP(-43.98,30) VDD33(113.5,30)
  rrect100% 10x10 smd paste+0 mask+0: P$1(-20,555)
  Top region: -87.45,651.5 -83.36,676.56 -69.78,698.01 -48.88,712.42 -24,717.5 -24,717.5 -19,717.5 6.45,712.44 28.02,698.02 42.44,676.45 47.5,651 47.5,651 47.5,650 47.5,649 42.44,623.55 28.02,601.98 6.45,587.56 -19,582.5 -19,582.5 -22,582.5 -47.64,587.73 -69.19,602.58 -83.21,624.68 -87.45,650.5 -87.45,650.5 -136.47,650.5 -128.41,605.54 -103.55,567.22 -65.78,541.53 -21,532.5 -21,532.5 -19,532.5 25.58,541.37 63.38,566.62 88.63,604.42 97.5,649 97.5,649 97.5,650 88.56,694.97 63.09,733.09 24.97,758.56 -20,767.5 -20,767.5 -21,767.5 -24,767.5 -68.01,758.62 -105.14,733.37 -129.56,695.7 -137.47,651.5 -137.47,651.5

## Part data
C1 C2 C3 C4 C5 C6 C7 C8 C9 C10 C11 C12 C13 C14 C15 C16 C17 C18 C19 C20 C25 C26 C27 C32 C33 C34 C35 C36: library part C0603, PackageName=C0603
C21 C22 C28 C29 C30 C31: library part C1206, PackageName=C1206
C23 C24: library part C0805, PackageName=C0805
D1 D10 D11 D12: library part LED_0805, PackageName=LED_0805
D2 D3 D4 D7 D9: library part SOD323_NEX-L, PackageName=SOD323_NEX-L
D5 D6: library part SOD-123_ONS-L, PackageName=SOD-123_ONS-L
GND_SER X3 X4: library part TH-0.75/0.6, PackageName=TH-0.75/0.6
H1 H2 H3 H4: library part SMT_SPACER_5MMX2.5M, PackageName=SMT_SPACER_5MMX2.5M
J1: library part SAMTEC_ADM6-30-01.5-L-4-2-A-TR, PackageName=SAMTEC_ADM6-30-01.5-L-4-2-A-TR
J2: library part CONN_QTH-030-02-L-D-A-K-FR_S00, PackageName=CONN_QTH-030-02-L-D-A-K-FR_S00
L1: library part IND_VLS3012HBX-3R3M_TDK-L, PackageName=IND_VLS3012HBX-3R3M_TDK-L
L2: library part HA72L-06301R5LFTR, PackageName=HA72L-06301R5LFTR
Q1 Q3: library part TO-236AB_NEX-L, PackageName=TO-236AB_NEX-L
Q2 Q4: library part TO-236_VIS-L, PackageName=TO-236_VIS-L
R1 R2 R3 R4 R5 R6 R7 R8 R9 R10 R11 R12 R13 R14 R15 R16 R17 R18 R19 R20 R21 R22 R23 R24 R25 R26 R27 R28: library part R0603, PackageName=R0603
SW1 SW2: library part EVQ-P7J01P, PackageName=EVQ-P7J01P
SWCLK SWDIO TP4 TP5 TP6 TP7 TP8 TP9 TP11 TP12 TP13 TP14 TP15 TP16 TP17 TP19: library part TP11R, PackageName=TP11R
U1: library part W25Q16JVUXIQ_WIN-L, PackageName=W25Q16JVUXIQ_WIN-L
U2: library part RP2040TR7_RPI-L, PackageName=RP2040TR7_RPI-L
U3: library part DDC0006A_L, PackageName=DDC0006A_L
U5: library part SQFN24_4X4, PackageName=SQFN24_4X4
W1: library part WIFI-RTL8188EUS, PackageName=WIFI-RTL8188EUS
XP1 XP2 XP3 XP4 XP5 XP6 XP7 XP8 XP9 XP10 XP11: library part SMT-PAD_R1-5MM, PackageName=SMT-PAD_R1-5MM
XTAL1 XTAL2: library part SMD3225_3.2X2.5X0.7_MTC-L, PackageName=SMD3225_3.2X2.5X0.7_MTC-L
U4: PackageName=RT7291AGQUF
X2: PackageName=FH12-30S-0.5SH

## Free pads (board coordinates)
  round 145.67 hole 145.67 unplated: MH1(847.2,275.13) MH1(847.2,1495.61) MH1(3307.83,275.13) MH1(3307.83,1495.61)
  round 37.4 hole 37.4 unplated: MH1(1029.89,361.75) MH2(1865.33,311.75)
  round 40 hole 40 unplated: MH1(1083.6,1331.75) MH2(1811.6,1331.75)

## Via types
v1: diameter 27.81/27.81 (per signal layer), hole 11.81, Top to Bottom, 420 vias
v2: diameter 29.78/29.78 (per signal layer), hole 13.78, Top to Bottom, 4 vias

## Nets (pads, with @x,y where several pads share a name; then routed paths per layer and width w, separated by ;. In a path a pad name is that pad's centre, name@x,y a point inside that pad or via, vN(x,y) a via of type N, cw(c..) or ccw(c..) an arc to the next point about the centre after c; other vN are vias at no path point)
+1V1: U2.23 U2.45 U2.50 | length 588.9
  Top w7: 3322,1046 3347.63,1046 U2.23@3348,1046.37 ; 3560,1030 3590.88,999.13 U2.45@3612,999.12 ; U2.50@3612,1077.88 3657.88,1077.88 3665,1085 3727,1085
  Top w12: 3260,947 3280,947 3292,959 3292,1023 v1(3306,1037) 3315,1046 3322,1046
  Bottom w12: v1(3306,1037) 3315,1046 3395,1046 v1(3396,1045)
  Bottom w13: v1(3660,980) v1(3675,965) 3675,1055 v1(3685,1065) v1(3685,1085)
+3V3: C1.1 C3.2 C5.1 C6.1 C13.1 C15.2 C32.1 C33.1 L1.1 R2.2 R4.2 R18.2 R19.2 R25.2 TP4.TP U1.8 U2.1 U2.10 U2.22 U2.33 U2.42 U2.44 U2.48 U2.49 U5.1 U5.9 U5.16 U5.18 W1.VDD33 X2.21 X2.22 X2.23 | length 10584.2
  Top w6: 3367.88,1062.13 3375,1055 3375,990 3400,965 3440.63,965 ; U2.1@3582.38,1202 U2.1@3584,1203.62
  Top w7: L1.1@2400,274 2400,205.12 2400.12,205 2400.12,125 ; 3325,1062 3347.88,1062 U2.22@3348,1062.12 3367.88,1062.13 ; C6.1@3440,1262 3440,1202.63 U2.10@3440.62,1202 ; 3440.63,965 U2.33@3440.62,938 3440.63,844.38 C15.2@3443,842 ; U2.48@3612,1046.37 3626.38,1046.38 3635,1055 3635,1060 3632.88,1062.13 U2.49@3612,1062.12
  Top w10: v2(2276.24,1183.76) 2295.53,1183.76 U5.18@2309.14,1170.15 ; v2(2287.93,1247.93) U5.16@2337.42,1198.44 ; v1(2373.55,1002.54) 2392.54,1002.54 2410,1020 2424.6,1020 C33.1@2439.8,1004.8 2420.15,1024.45 U5.1@2420.15,1059.14 ; U5.9@2462.58,1198.44 v1(2487.07,1222.93) 2507,1242.86 C32.1@2507,1260 ; R25.2@2693,1260 v1(2730.91,1260) ; C3.2@3260,1103 3301,1062 3325,1062 ; 3400,480 3405,480 ; 3585,1165 3585,1170 ; 3777,1260 3777,1220.58 U1.8@3783.06,1214.53
  Top w12: U2.1@3584,1203.62 3586,1205.63 C5.1@3586,1283 3605,1283 R2.2@3645,1323 3645,1310 3660,1295 3760,1295 ; 3760,1295 3775,1280 3775,1262 3777,1260 C1.1@3777,1320 3777,1312 3760,1295
  Top w13: 3635,1055 3630,1060 3625,1060 3625,1051 3627.5,1048.5 3661.83,1048.5 3685.33,1025 3727,1025
  Top w20: v1(380,100) 390,90 R19.2@557,90 ; v1(1850,750) 1955,645 3020,645 v1(3045,620)
  Top w25: 3350,480 3400,480 3465,480
  Top w30: 2400.12,125 2475,125 2505,155 ; 2515,314 2515,165 2505,155 ; 3350,480 3285,480 3261.5,456.5 3203.83,456.5 3147.33,400 v1(3040,400) 2750,400 2665,315 2665,189.72 2630.28,155 2505,155 ; 3465,480 3620,480 3735,595 3735,815 ; R4.2@3630,813 C13.1@3690,813 ; C13.1@3690,813 3692,815 3735,815 ; C13.1@3690,813 3727,850 3727,885 3727,823 3735,815
  Bottom w10: v2(2287.93,1247.93) 2276.24,1236.24 v2(2276.24,1183.76) 2335,1125 ; W1.VDD33@2327.14,1002.54 v1(2373.55,1002.54) ; W1.VDD33@2331.5,1020 2331.5,1121.5 2335,1125 ; v1(2730.91,1260) 2524.14,1260 v1(2487.07,1222.93) 2487.07,1213.81 2431.09,1157.83 2431.09,1146.09 2410,1125 2335,1125
  Bottom w12: TP4.TP@150,750 v1@200,750
  Bottom w20: v1(1850,750) 1850,850 1915,915 2305,915 2330,940 2330,1003.4 W1.VDD33@2327.88,1005.51 ; W1.VDD33@2327.14,1002.54 W1.VDD33@2327.88,1005.51 ; W1.VDD33@2331.5,1020 W1.VDD33@2327.88,1005.51 ; v1(3040,400) 3045,405 v1(3045,620)
  Bottom w30: v1(217,747) 214,750 200,750 65,750 28.44,713.44 28.44,398.44 86.87,340 260,340 380,220 v1(380,100) 380,60 414.13,25.87 1310.87,25.87 1348.69,63.69 1568.19,63.69 1572.09,59.78 2499.78,59.78 2525,85 v1(2525,300)
  other v1: 2500,300 2550,300 2500,325 2525,325 2550,325 2500,350 2525,350 2550,350 198,728 217,728 198,747 198,766 217,766
+5V: C28.1 C29.1 C30.1 C31.1 J1.A01 J1.A02 J1.B01 J1.B02 J1.C01 J1.C02 J1.D01 J1.D02 L2.P$1 R22.2 TP5.TP U4.P$7 X2.26 X2.27 X2.28 X2.29 X2.30 | length 1276.2
  Top w10: R22.2@1007,130 1007,242 1015,250
  Top w50: X2.30@262.95,589.57 v2(301.26,551.26) 485,367.52 485,315 521.09,278.91 602.1,278.91 679.96,201.05 679.96,200.04 752.98,127.02 952.02,127.02 1015,190 1015,250 1015,290
  Bottom w12: TP5.TP@250,550 251.26,551.26 v2(301.26,551.26)
+12V: C19.1 C23.1 C24.1 R11.1 TP12.TP TP13.TP U4.P$1 X2.1 X2.2 X2.3 X2.4 X2.5 X2.6 | length 4134.5
  Top w6: 448.6,711 448.6,592.4 458,583
  Top w10: 448.6,711 448.6,713.6 v1(510,775) ; 483.39,986.61 C23.1@517.76,986.61 ; v1(550,1060) 550,1018.86 C23.1@517.76,986.61 ; C24.1@589.49,986.61 C23.1@517.76,986.61 ; R11.1@1655,92 1688.6,92 1708,72.6 1750,114.6 1750,135 1800,185 1910,185 1945,220 1945,505 1960,520
  Top w15: C19.1@2103,445 C19.1@2113.7,446.3
  Top w45: v1(406,1197) 406,1247 454,1295 855,1295 900,1250 900,1140 965,1075 1275,1075 1385,965 1385,740 1500,625 1855,625 1960,520 2110,520 2125,505 2125,457.6 C19.1@2113.7,446.3
  Top w83: v1(407,1177) 407,1063 483.39,986.61
  Bottom w10: v1(510,775) 545,775 565,795 565,1025 550,1040 v1(550,1060)
  Bottom w50: TP12.TP@354,1248 TP13.TP@454,1248
  other v1: 387,1177 426,1177 446,1177 386,1197 426,1197 446,1197
ADC_AVDD: R4.1 U2.43 | length 272.3
  Top w6: U2.43@3612,967.62 3615,964.63 v1@3615,950
  Top w7: 3615,962.5 U2.43@3615,964.63
  Top w8: 3570,813 3574,813 R4.1@3630,757
  Top w10: 3570,813 3570,850 v1(3575,855) ; v1(3615,945) 3615,950 3615,962.5
  Bottom w8: v1(3575,855) 3615,895 v1(3615,945)
BOOTSEL_MCU: J2.17
D_N: U5.4 | length 2002.8
  Top w7: U5.4@2462.58,1101.56 2485.21,1078.94 2490.86,1078.94 2550,1019.8 2550,918.03 2576.23,891.8 v1(2753.2,891.8)
  Top w13: 3855,907 3878.72,907 v1(3890.36,895.36)
  Bottom w7: v1(2753.2,891.8) 2764.2,902.8 2962.2,902.8 3157,708 3168.35,708 cw(c3168.35,698.25) 3178.1,698.25 3178.1,692.54 ccw(c3187.85,692.54) 3187.85,682.79 3188.09,682.79 ccw(c3188.09,692.54) 3197.84,692.54 3197.84,698.25 cw(c3207.59,698.25) 3207.59,708 3207.83,708 cw(c3207.83,698.25) 3217.58,698.25 3217.58,692.54 ccw(c3227.33,692.54) 3227.33,682.79 3227.57,682.79 ccw(c3227.57,692.54) 3237.32,692.54 3237.32,698.25 cw(c3247.07,698.25) 3247.07,708 3247.31,708 cw(c3247.31,698.25) 3257.06,698.25 3257.06,692.54 ccw(c3266.81,692.54) 3266.81,682.79 3267.06,682.79 ccw(c3267.06,692.54) 3276.81,692.54 3276.81,698.25 cw(c3286.56,698.25) 3286.56,708 3286.8,708 cw(c3286.8,698.25) 3296.55,698.25 3296.55,692.54 ccw(c3306.3,692.54) 3306.3,682.79 3306.54,682.79 ccw(c3306.54,692.54) 3316.29,692.54 3316.29,698.25 cw(c3326.04,698.25) 3326.04,708 3326.28,708 cw(c3326.28,698.25) 3336.03,698.25 3336.03,692.54 ccw(c3345.78,692.54) 3345.78,682.79 3346.02,682.79 ccw(c3346.02,692.54) 3355.77,692.54 3355.77,698.25 cw(c3365.52,698.25) 3365.52,708 3365.76,708 cw(c3365.76,698.25) 3375.51,698.25 3375.51,692.54 ccw(c3385.26,692.54) 3385.26,682.79 3385.5,682.79 ccw(c3385.5,692.54) 3395.25,692.54 3395.25,698.25 cw(c3405,698.25) 3405,708 3689.97,708 3796.97,815 3850,815 3890.36,855.36 v1(3890.36,895.36)
D_P: U5.5 | length 1954.8
  Top w7: U5.5@2476.72,1115.71 2476.72,1110.05 2562,1024.77 2562,923 2580,905 2720,905 v1(2730,915)
  Top w13: 3855,1068 3898.72,1068 v1(3905.86,1060.86)
  Bottom w7: v1(2730,915) 2966.97,915 3161.97,720 3685,720 3792,827 3835,827 3860,852 3860,1000 3905.86,1045.86 v1(3905.86,1060.86)
EN_3V3_BUCK:  | length 60.7
  Top w10: 1784,110 1796.6,110 1835,81
EN_VOXL: R20.2 U4.P$13 | length 967.8
  Top w7: U4.P$13@684.25,1005.12 684.25,1074.25
  Top w8: 684.25,1074.25 705,1095
  Top w10: 486,635 486,721.81 518.07,753.87 578.87,753.87 v1(580,755) ; R20.2@578,1085 578,1113 v1(587.4,1122.4) 638.98,1173.98 638.98,1193.05 646.52,1200.59 698.68,1200.59 705,1194.27 705,1095
  Bottom w10: v1(580,755) 580,1115 v1(587.4,1122.4)

## Text inside footprints (layer, text, board x,y; h text height)
Q4: Measures "0.055in/1.397mm" at 984,685 h21.25 r180; Measures "0.12in/3.048mm" at 634,401 h21.25 r180; Measures "0.02in/0.508mm" at 634,501 h21.25 r180; Measures "0.075in/1.9mm" at 622,870 h21.25 r180; Measures "0.024in/0.61mm" at 331,645 h21.25 r180; Measures "0.104in/2.642mm" at 256,685 h21.25 r180; Measures "Alt 2 Padstyle: OX90Y60D30P" at 1069,1206 h42.5 r180; Measures "Alt 1 Padstyle: OX60Y90D30P" at 1069,1131 h42.5 r180; Measures "Bottom Padstyle: RX20Y40D0T" at 1069,1056 h42.5 r180; Measures "Top Padstyle: RX20Y40D0T" at 1016,981 h42.5 r180
SWCLK: Bottom 3D Body ">TP_SIGNAL_NAME" at 2945,1020 h33.46 r270
SWDIO: Bottom 3D Body ">TP_SIGNAL_NAME" at 3100,1100 h33.46 r90
TP4: Bottom 3D Body ">TP_SIGNAL_NAME" at 150,675 h33.46
TP5: Bottom 3D Body ">TP_SIGNAL_NAME" at 250,475 h33.46
TP6: Bottom 3D Body ">TP_SIGNAL_NAME" at 650,740 h33.46
TP7: Bottom 3D Body ">TP_SIGNAL_NAME" at 670,1125 h33.46
TP8: Bottom 3D Body ">TP_SIGNAL_NAME" at 300,-25 h33.46
TP9: Bottom 3D Body ">TP_SIGNAL_NAME" at 50,1425 h33.46
TP11: Bottom 3D Body ">TP_SIGNAL_NAME" at 3030,1100 h33.46 r90
TP12: Bottom 3D Body ">TP_SIGNAL_NAME" at 279,1248 h33.46 r270
TP13: Bottom 3D Body ">TP_SIGNAL_NAME" at 379,1248 h33.46 r270
TP14: Bottom 3D Body ">TP_SIGNAL_NAME" at 225,450 h33.46 r90
TP15: Bottom 3D Body ">TP_SIGNAL_NAME" at 325,450 h33.46 r90
TP16: Bottom 3D Body ">TP_SIGNAL_NAME" at 295,900 h33.46 r90
TP17: Bottom 3D Body ">TP_SIGNAL_NAME" at 295,995 h33.46 r90
TP19: Bottom 3D Body ">TP_SIGNAL_NAME" at 2365,1260 h33.46
U1: Measures "0.118in/2.997mm" at 3571,1001 h21.25; Measures "0.079in/2.007mm" at 3903,1173 h21.25; Measures "0.02in/0.5mm" at 3307,1192 h21.25; Measures "0.02in/0.508mm" at 3533,1335 h21.25; Measures "0.118in/3mm" at 3613,1485 h21.25; Measures "Alt 2 Padstyle: OX90Y60D30P" at 3147,535 h42.5; Measures "Alt 1 Padstyle: OX60Y90D30P" at 3147,595 h42.5; Measures "Heat Tab Padstyle: RX8Y63D0T" at 3117,715 h42.5; Measures "Default Padstyle: RX28Y10D0T" at 3131,775 h42.5
U2: Measures "0.276in/7.01mm" at 3168,1218 h21.25 r270; Measures "0.276in/7.01mm" at 3468,1653 h21.25 r270; Measures "0.276in/7.01mm" at 3468,733 h21.25 r270; Measures "0.276in/7.01mm" at 3817,1218 h21.25 r270; Measures "0.02in/0.508mm" at 3742,1090 h21.25 r270; Measures "0.016in/0.4mm" at 3562,808 h21.25 r270; Measures "Alt 2 Padstyle: OX90Y60D30P" at 2784,1653 h42.5 r270; Measures "Alt 1 Padstyle: OX60Y90D30P" at 2844,1653 h42.5 r270; Measures "Heat Tab Padstyle: RX126Y126D0T" at 2964,1751 h42.5 r270; Measures "Default Padstyle: RX7Y28D0T" at 3024,1646 h42.5 r270; tDocu "*" at 3565,1211 h42.5 r270
U5: Measures "0.161in/4.089mm" at 2694.86,1220 h21.25 r135; Measures "0.161in/4.089mm" at 2798.81,768.16 h21.25 r135; Measures "0.161in/4.089mm" at 2207.67,1359.3 h21.25 r135; Measures "0.161in/4.089mm" at 2311.61,836.75 h21.25 r135; Measures "0.02in/0.508mm" at 2307.37,948.47 h21.25 r135; Measures "0.02in/0.508mm" at 2233.12,1277.28 h21.25 r135; Measures "Alt 2 Padstyle: OX90Y60D30P" at 3269.03,1194.55 h42.5 r135; Measures "Alt 1 Padstyle: OX60Y90D30P" at 3226.61,1152.12 h42.5 r135; Measures "Heat Tab Padstyle: RX98Y98D0T" at 3179.23,1029.79 h42.5 r135; Measures "Default Padstyle: RX10Y36D0T" at 3110.64,1013.53 h42.5 r135
XTAL1: Measures "0.047in/1.194mm" at 2571,1114 h21.25; Measures "0.13in/3.302mm" at 3481,1073 h21.25; Measures "0in/0mm" at 2788,1073 h21.25; Measures "0in/0mm" at 3281,1073 h21.25; Measures "0.102in/2.591mm" at 2951,875 h21.25; Measures "0.037in/0.94mm" at 2995,1270 h21.25; Measures "Alternate 2 Padstyle: OX90Y60D30P" at 2398,470 h42.5; Measures "Alternate 1 Padstyle: OX60Y90D30P" at 2398,570 h42.5; Measures "Outer Pad Padstyle: RX47Y59D0T" at 2451,670 h42.5; Measures "Inner Pad Padstyle: RX47Y-4D0T" at 2444,770 h42.5; tDocu "*" at 3051,1105 h42.5
XTAL2: Measures "0.047in/1.194mm" at 2640.64,1366.62 h21.25 r225; Measures "0.13in/3.302mm" at 1968.18,752.15 h21.25 r225; Measures "0in/0mm" at 2458.2,1242.17 h21.25 r225; Measures "0in/0mm" at 2109.6,893.57 h21.25 r225; Measures "0.102in/2.591mm" at 2202.94,1266.92 h21.25 r225; Measures "0.037in/0.94mm" at 2451.13,956.5 h21.25 r225; Measures "Alternate 2 Padstyle: OX90Y60D30P" at 2307.59,1944.33 h42.5 r225; Measures "Alternate 1 Padstyle: OX60Y90D30P" at 2378.3,1873.62 h42.5 r225; Measures "Outer Pad Padstyle: RX47Y59D0T" at 2411.53,1765.43 h42.5 r225; Measures "Inner Pad Padstyle: RX47Y-4D0T" at 2487.19,1699.67 h42.5 r225; tDocu "*" at 2294.86,1033.58 h42.5 r225